# Altium PCB nexnclock_one_in12_6x_rev_1_0.PcbDoc (part 1 of 2)
Units mm, origin at the board's own origin, x right, y up, seen from the top; angles counter-clockwise.
Board outline 156 x 35 mm, 2 copper layers (Top Layer, Bottom Layer), stack 1.571 mm thick; 50 components, 43 nets, 219 pads, 67 vias.
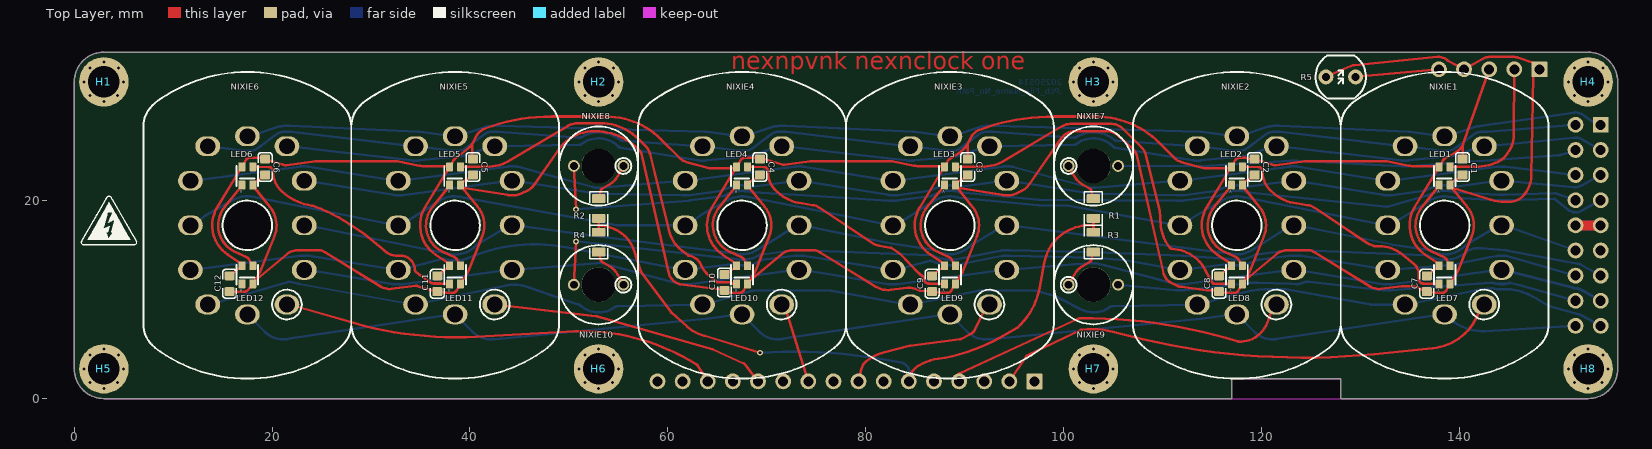
[diagram p0: Top Layer view]
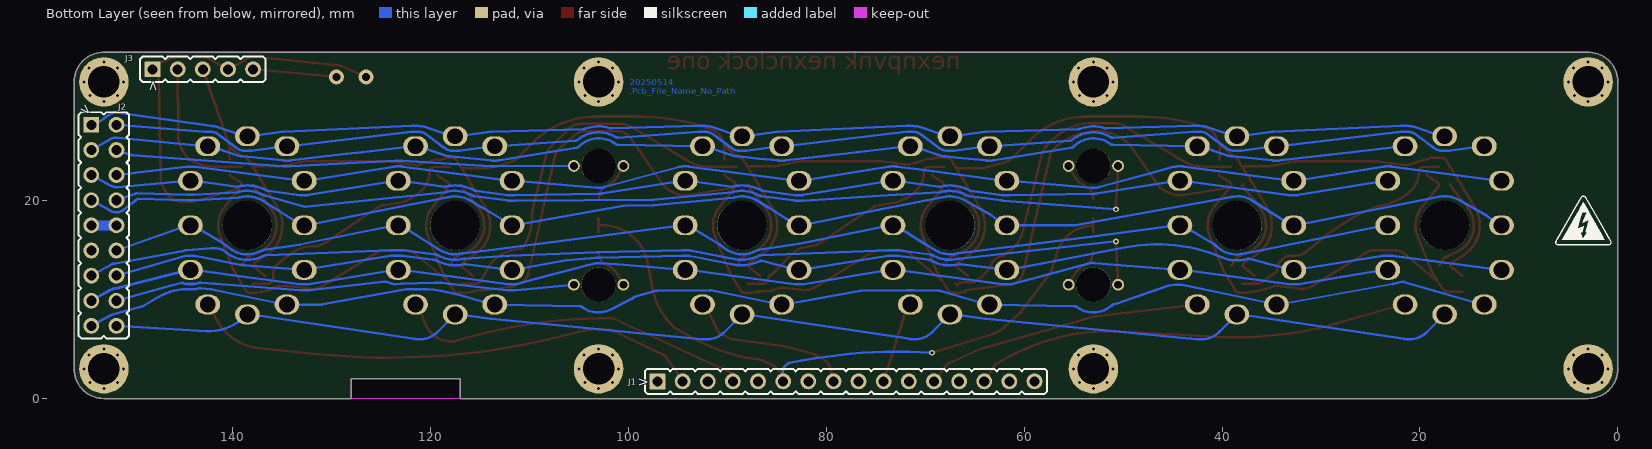
[diagram p1: Bottom Layer view, seen from below]
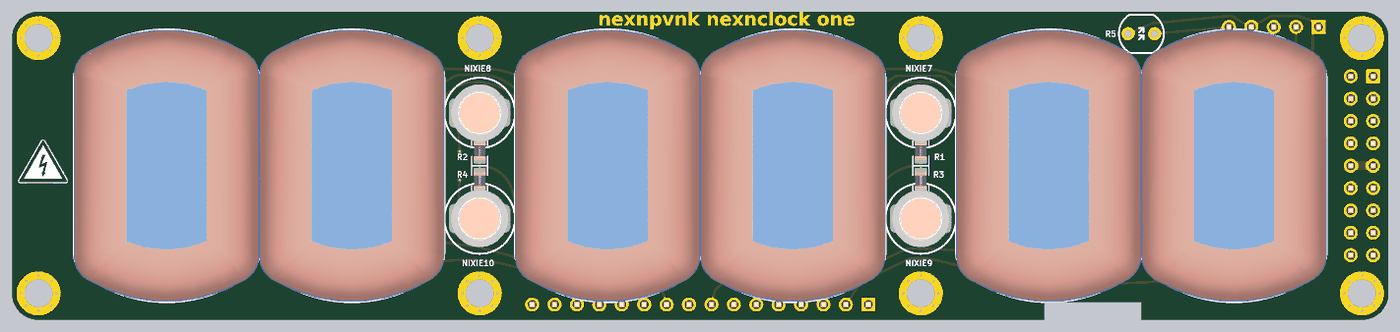
[diagram p3: 3D render of the assembled board from above, using the file's embedded part models]
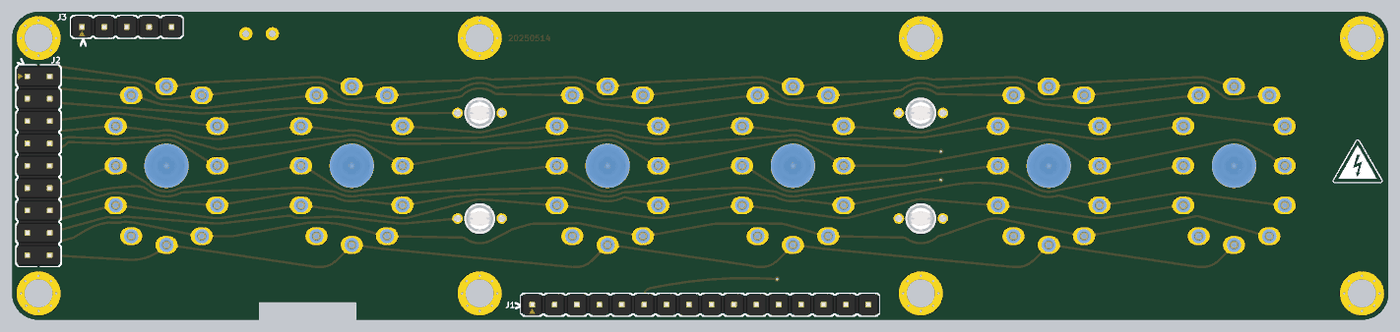
[diagram p4: 3D render of the assembled board from below, using the file's embedded part models]

## Layer stack, top to bottom
Top Solder: solder mask 0.0102, Solder Resist, Dk 3.5
Top Layer: signal copper 0.0356
Dielectric 1: dielectric 1.5, FR-4, Dk 4.8
Bottom Layer: signal copper 0.0356
Bottom Solder: solder mask 0.0102, Solder Resist, Dk 3.5

## Board outline
3,0 cw(c3,3) 0,3 0,32 cw(c3,32) 3,35 153,35 cw(c153,32) 156,32 156,3 cw(c153,3) 153,0 128,0 128,2 117,2 117,0

## Design rules (kind name [scope] priority, off if disabled: settings)
Clearance [All] p1: gap=0.127 ignorepadtopadclearanceinfootprint=FALSE except(0: SMDPad-Text THPad-Text Via-Text Fill-Text Poly-Text Region-Text Text-Text; 0.2: Arc-Arc Arc-SMDPad Track-SMDPad; 0.3: Arc-Track Arc-THPad Arc-Via Arc-Fill Arc-Poly Arc-Region Arc-Text Arc-Hole Track-Track Track-THPad Track-Via Track-Fill Track-Poly Track-Region Track-Text Track-Hole)
ComponentClearance ComponentClearance_1 [(Footprint = 'RSH31A')] p1: gap=-5 collisioncheckmode=3 verticalgap=-5 showdistances=FALSE
ComponentClearance [All] p2: gap=0 collisioncheckmode=3 verticalgap=0 showdistances=FALSE
DiffPairsRouting [All] p1: maxlimit=1 minlimit=0.127 mostfreqgap=0.3 toplayer_minwidth=0.127 toplayer_maxwidth=0.381 toplayer_prefwidth=0.3 bottomlayer_minwidth=0.127 bottomlayer_maxwidth=0.381 bottomlayer_prefwidth=0.3 maxuncoupledlength=12.7
Height [All] p1: minheight=0 maxheight=100 prefheight=12.7
HoleSize [All] p1: absolutevalues=TRUE maxlimit=5 minlimit=0.025 maxpercent=80.000 minpercent=20.000
HoleToHoleClearance [All] p1: gap=0.127 allowstackedmicrovias=TRUE
MinimumSolderMaskSliver [All] p1: minsoldermaskwidth=0.05
PolygonConnect PolygonConnect_1 [All] p1: thpad.connectstyle=Relief thpad.reliefconductorwidth=0.254 thpad.reliefentries=4 thpad.polygonreliefangle="90 Angle" thpad.airgapwidth=0.127 smdpad.connectstyle=Relief smdpad.reliefconductorwidth=0.254 smdpad.reliefentries=4 smdpad.polygonreliefangle="90 Angle" smdpad.airgapwidth=0.127 via.connectstyle=Direct via.reliefconductorwidth=0.254 via.reliefentries=4 via.polygonreliefangle="90 Angle" via.airgapwidth=0.254
PolygonConnect PolygonConnect_2 [HasFootprint('R0201')] p2: thpad.connectstyle=Relief thpad.reliefconductorwidth=0.127 thpad.reliefentries=4 thpad.polygonreliefangle="90 Angle" thpad.airgapwidth=0.127 smdpad.connectstyle=Relief smdpad.reliefconductorwidth=0.127 smdpad.reliefentries=4 smdpad.polygonreliefangle="90 Angle" smdpad.airgapwidth=0.127 via.connectstyle=Direct via.reliefconductorwidth=0.254 via.reliefentries=4 via.polygonreliefangle="90 Angle" via.airgapwidth=0.254
RoutingVias [All] p1: holewidth=0.3 width=0.6 viastyle="Through Hole" minholewidth=0.1 minwidth=0.3 maxholewidth=1 maxwidth=1.27
SilkToSilkClearance [All] p1: silktosilkclearance=0
SilkToSolderMaskClearance [IsPad] p1: minsilkscreentomaskgap=0.127 clearancetoexposedcopper=TRUE
SolderMaskExpansion [All] p1: expansion=0.05 istentingtop=FALSE
SupplyNets "Schematic Supply Nets_2" [InNet('HVGND')] p1: voltage=0.000
SupplyNets "Schematic Supply Nets_1" [InNet('VCC_5V0')] p2: voltage=0.000
SupplyNets "Schematic Supply Nets" [InNet('GND')] p3: voltage=0.000
Width [All] p1: maxlimit=6 minlimit=0.2 preferedwidth=0.254
22 further rules are at their usual default settings.

## Components (designator, comment, footprint, x,y, rotation, side; value= is the part's Value field where it differs from the comment)
C1 "CAP" C0603 140.3,23.4 r270 top value=100nF
C2 "CAP" C0603 119.3,23.4 r270 top value=100nF
C3 "CAP" C0603 90.3,23.4 r270 top value=100nF
C4 "CAP" C0603 69.3,23.4 r270 top value=100nF
C5 "CAP" C0603 40.3,23.4 r270 top value=100nF
C6 "CAP" C0603 19.3,23.4 r270 top value=100nF
C7 "CAP" C0603 136.7,11.6 r270 top value=100nF
C8 "CAP" C0603 115.7,11.6 r270 top value=100nF
C9 "CAP" C0603 86.7,11.6 r270 top value=100nF
C10 "CAP" C0603 65.717,11.728 r270 top value=100nF
C11 "CAP" C0603 36.7,11.6 r270 top value=100nF
C12 "CAP" C0603 15.7,11.6 r270 top value=100nF
H1 "MOUNT_HOLE" MOUNT_HOLE_D_3_2_MM 3,32 r0 top locked
H2 "MOUNT_HOLE" MOUNT_HOLE_D_3_2_MM 53,32 r0 top
H3 "MOUNT_HOLE" MOUNT_HOLE_D_3_2_MM 103,32 r0 top
H4 "MOUNT_HOLE" MOUNT_HOLE_D_3_2_MM 153,32 r0 top
H5 "MOUNT_HOLE" MOUNT_HOLE_D_3_2_MM 3,3 r0 top locked
H6 "MOUNT_HOLE" MOUNT_HOLE_D_3_2_MM 53,3 r0 top
H7 "MOUNT_HOLE" MOUNT_HOLE_D_3_2_MM 103,3 r0 top
H8 "MOUNT_HOLE" MOUNT_HOLE_D_3_2_MM 153,3 r0 top
J1 "P_HEADER_1X16" P_HEADER_STRAIGHT_2_54_1X16 78,1.73 r180 bottom
J2 "P_HEADER_2X9" P_HEADER_STRAIGHT_2_54_2X9 153,17.5 r270 bottom locked
J3 "P_HEADER_1X5" P_HEADER_STRAIGHT_2_54_1X5 143,33.27 r180 bottom
LED1 "WS2812B-2020" LED-SMD_4P-L2.0-W2.0-TL_WS2812B-2020 138.5,22.5 r90 top
LED2 "WS2812B-2020" LED-SMD_4P-L2.0-W2.0-TL_WS2812B-2020 117.5,22.5 r90 top
LED3 "WS2812B-2020" LED-SMD_4P-L2.0-W2.0-TL_WS2812B-2020 88.5,22.5 r90 top
LED4 "WS2812B-2020" LED-SMD_4P-L2.0-W2.0-TL_WS2812B-2020 67.5,22.5 r90 top
LED5 "WS2812B-2020" LED-SMD_4P-L2.0-W2.0-TL_WS2812B-2020 38.5,22.5 r90 top
LED6 "WS2812B-2020" LED-SMD_4P-L2.0-W2.0-TL_WS2812B-2020 17.5,22.5 r90 top
LED7 "WS2812B-2020" LED-SMD_4P-L2.0-W2.0-TL_WS2812B-2020 138.5,12.5 r90 top
LED8 "WS2812B-2020" LED-SMD_4P-L2.0-W2.0-TL_WS2812B-2020 117.5,12.5 r90 top
LED9 "WS2812B-2020" LED-SMD_4P-L2.0-W2.0-TL_WS2812B-2020 88.5,12.5 r90 top
LED10 "WS2812B-2020" LED-SMD_4P-L2.0-W2.0-TL_WS2812B-2020 67.5,12.5 r90 top
LED11 "WS2812B-2020" LED-SMD_4P-L2.0-W2.0-TL_WS2812B-2020 38.5,12.5 r90 top
LED12 "WS2812B-2020" LED-SMD_4P-L2.0-W2.0-TL_WS2812B-2020 17.5,12.5 r90 top
NIXIE1 "IN-12" RSH31A 138.5,17.5 r0 top locked
NIXIE2 "IN-12" RSH31A 117.5,17.5 r0 top locked
NIXIE3 "IN-12" RSH31A 88.5,17.5 r0 top locked
NIXIE4 "IN-12" RSH31A 67.5,17.5 r0 top locked
NIXIE5 "IN-12" RSH31A 38.5,17.5 r0 top locked
NIXIE6 "IN-12" RSH31A 17.5,17.5 r0 top locked
NIXIE7 "NEON_LAMP_WITH_HOLE" NEON_LAMP_WITH_HOLE 103,23.5 r0 top
NIXIE8 "NEON_LAMP_WITH_HOLE" NEON_LAMP_WITH_HOLE 53,23.5 r180 top
NIXIE9 "NEON_LAMP_WITH_HOLE" NEON_LAMP_WITH_HOLE 103,11.5 r0 top
NIXIE10 "NEON_LAMP_WITH_HOLE" NEON_LAMP_WITH_HOLE 53,11.5 r180 top
R1 "RESISTOR" R0805 103,19.2 r90 top value=10k
R2 "RESISTOR" R0805 53,19.2 r90 top value=10k
R3 "RESISTOR" R0805 103,15.8 r270 top value=10k
R4 "RESISTOR" R0805 53,15.8 r270 top value=10k
R5 "PHOTORESISTOR" GL55XX_2 128,32.5 r180 top value=10k

## Footprints (in the part's own frame and the unit in brackets; to place one, negate y for a bottom-side part, rotate by r counter-clockwise, add the part's x,y. Pads: shape width x height; smd on the part's side, far side on the other; paste and mask are expansions set on the pad)
C0603 [mm]
  rrect25% 0.9x1 smd mask+0.05: 1(-0.8,0) 2(0.8,0)
  silkscreen extent -1.45,-0.7 1.45,0.7, body extent -0.8,-0.4 0.8,0.4, height 0.82
GL55XX_2 [mm] "Photoresistor 3mm pitch"
  round 1.5 hole 0.8 mask+0.05: 1(-1.5,0) 2(1.5,0)
  silkscreen extent -2.55,-2.15 2.55,2.2
LED-SMD_4P-L2.0-W2.0-TL_WS2812B-2020 [mm]
  rrect20% 0.9x0.7 smd mask+0.05: 1(-0.915,0.55) 2(-0.915,-0.55) 3(0.915,-0.55) 4(0.915,0.55)
  silkscreen extent -1,-1.1 1,1.1, body extent -1.1,-1 1.1,1, height 0.84
MOUNT_HOLE_D_3_2_MM [mm]
  round 5 hole 3.2 mask+0.05: 1(0,0)
NEON_LAMP_WITH_HOLE [mm] "INS-1, IN-3"
  round 1.2 hole 0.8 unplated mask+0.05: 1(-2.5,0) 2(2.5,0)
  round 3.5 hole 3.5 unplated mask+0.05: HOLE(0,0)
  silkscreen extent -4,-4 4,4, body extent -3.5,-3.25 3.5,3.25, height 25
P_HEADER_STRAIGHT_2_54_1X5 [mm]
  rrect10% 1.6x1.6 hole 1.02 paste-2539.97 mask+0.05: 1(-5.08,0)
  round 1.6 hole 1.02 paste-2539.97 mask+0.05: 2(-2.54,0) 3(0,0)
  round 1.6 hole 1.02 mask+0.05: 4(2.54,0) 5(5.08,0)
  silkscreen extent -6.35,-1.27 6.35,1.27, body extent -6.35,-1.25 6.35,1.25, height 8.55
P_HEADER_STRAIGHT_2_54_1X16 [mm]
  rrect10% 1.6x1.6 hole 1.02 paste-2539.97 mask+0.05: 1(-19.05,0)
  round 1.6 hole 1.02 paste-2539.97 mask+0.05: 2(-16.51,0) 3(-13.97,0)
  round 1.6 hole 1.02 mask+0.05: 4(-11.43,0) 5(-8.89,0) 6(-6.35,0) 7(-3.81,0) 8(-1.27,0) 9(1.27,0) 10(3.81,0) 11(6.35,0) 12(8.89,0) 13(11.43,0) 14(13.97,0) 15(16.51,0) 16(19.05,0)
  silkscreen extent -20.32,-1.27 20.32,1.27, body extent -20.32,-1.25 20.32,1.25, height 8.55
P_HEADER_STRAIGHT_2_54_2X9 [mm]
  rrect10% 1.6x1.6 hole 1.02 paste-2539.97 mask+0.05: 1(-10.16,-1.27)
  round 1.6 hole 1.02 paste-2539.97 mask+0.05: 2(-10.16,1.27) 3(-7.62,-1.27)
  round 1.6 hole 1.02 mask+0.05: 4(-7.62,1.27) 5(-5.08,-1.27) 6(-5.08,1.27) 7(-2.54,-1.27) 8(-2.54,1.27) 9(0,-1.27) 10(0,1.27) 11(2.54,-1.27) 12(2.54,1.27) 13(5.08,-1.27) 14(5.08,1.27) 15(7.62,-1.27) 16(7.62,1.27) 17(10.16,-1.27) 18(10.16,1.27)
  silkscreen extent -11.43,-2.54 11.43,2.54, body extent -11.43,-2.52 11.43,2.48, height 8.55
R0805 [mm]
  rrect20% 0.9x1.35 smd mask+0.05: 1(-1,0) 2(1,0)
  silkscreen extent -1.7,-0.9 1.7,0.9, body extent -1,-0.63 1,0.63, height 0.53
RSH31A [mm] "IN-12A, IN-12B, IN-15A, IN-15B"
  oval 2.5x2 hole 1.6 paste-2539.97 mask+0.05: 1(4,-8) 2(5.75,-4.5) 3(5.75,0) 4(5.75,4.5) 5(4,8) 6(0,9) 7(-4,8) 8(-5.75,4.5) 9(-5.75,0) 10(-5.75,-4.5) 11(-4,-8) 12(0,-9)
  silkscreen extent -10.5,-15.5 10.5,15.5, body extent -10.5,-15.48 10.5,15.48, height 29

## Part data
C1 C2 C3 C4 C5 C6 C7 C8 C9 C10 C11 C12: Dielectric=X7R, Manufacturer=_manufacturer, Voltage=50V, Part Reference=CC0603KRX7R9BB104, PCB Footprint=C0603
H1 H2 H3 H4 H5 H6 H7 H8 J1 J2 J3 LED1 LED2 LED3 LED4 LED5 LED6 LED7 LED8 LED9 LED10 LED11 LED12 R5: Manufacturer=_manufacturer
  H1 H2 H3 H4 H5 H6 H7 H8: PCB Footprint=MOUNT_HOLE_D_3_2_MM, Procurement Type=DNP
  J1: Part Reference=_part, PCB Footprint=P_HEADER_STRAIGHT_2_54_1X16
  J2: Part Reference=_part, PCB Footprint=P_HEADER_STRAIGHT_2_54_2X9
  J3: Part Reference=_part, PCB Footprint=P_HEADER_STRAIGHT_2_54_1X5
  LED1 LED2 LED3 LED4 LED5 LED6 LED7 LED8 LED9 LED10 LED11 LED12: Part Reference=_part, PCB Footprint=LED-SMD_4P-L2.0-W2.0-TL_WS2812B-2020
  R5: Part Reference=_part, PCB Footprint=GL55XX_2
NIXIE1 NIXIE2 NIXIE3 NIXIE4 NIXIE5 NIXIE6: Manufacturer=USSR, Part Reference=_part, PCB Footprint=RSH31A, Procurement Type=DNP
NIXIE7 NIXIE8 NIXIE9 NIXIE10: "INS-1, IN-3", Manufacturer=USSR, Part Reference=_part, PCB Footprint=NEON_LAMP_WITH_HOLE, Procurement Type=DNP
R1 R2 R3 R4: Manufacturer=_manufacturer, Tolerancy=5%, Part Reference=_part, PCB Footprint=R0805

## Free pads (board coordinates)
  round 5 hole 5 mask+0.05: 1(17.5,17.5) 1(38.5,17.5) 1(67.5,17.5) 1(88.5,17.5) 1(117.5,17.5) 1(138.5,17.5)

## Via types
v1: diameter 0.6, hole 0.3, Top Layer to Bottom Layer, tented bottom, 64 vias
v2: diameter 0.6, hole 0.3, Top Layer to Bottom Layer, tented both sides, 2 vias
v3: diameter 0.6, hole 0.3, Top Layer to Bottom Layer, tented top, 1 vias

## Nets (pads, with @x,y where several pads share a name; then routed paths per layer and width w, separated by ;. In a path a pad name is that pad's centre, name@x,y a point inside that pad or via, vN(x,y) a via of type N, cw(c..) or ccw(c..) an arc to the next point about the centre after c; other vN are vias at no path point)
A0: J1.2 NIXIE1.1 | length 52.4
  Top Layer w0.254: J1.2@94.51,1.73 96.193,4.218 cw(c96.566,3.966) 96.372,4.372 101.732,6.925 cw(c101.925,6.518) 101.876,6.966 cw(c102.803,-1.728) 101.877,6.966 cw(c102.803,-1.728) 104.95,6.747 106.566,6.338 ccw(c124.281,76.227) 131.392,4.479 131.395,4.479 137.275,5.068 ccw(c136.725,10.586) 141.9,8.591 142.25,9.5 NIXIE1.1@142.5,9.5
A1: J1.4 NIXIE2.1 | length 36.5
  Top Layer w0.254: J1.4@89.43,1.73 89.316,1.932 cw(c89.708,2.153) 89.519,2.562 101.39,8.033 cw(c101.712,7.337) 101.702,8.104 cw(c101.712,7.337) 101.703,8.104 cw(c102.108,-44.322) 117.549,5.78 ccw(c117.679,6.211) 117.644,5.762 ccw(c117.679,6.211) 117.649,5.762 ccw(c117.845,8.651) 120.558,7.639 121.25,9.5 NIXIE2.1@121.5,9.5
A2: J1.6 R1.1 R2.1 R3.1 R4.1 | length 68.4
  Top Layer w0.254: R4.1@53,16.8 53,17.457 ; R2.1@53,18.2 53,17.457 ; v3(69.3,4.625) 63.662,6.364 cw(c64.562,10.156) 61.963,7.252 cw(c64.562,10.156) 61.962,7.253 60.377,8.673 60.375,8.674 cw(c60.546,8.862) 60.373,8.676 cw(c60.546,8.862) 60.344,8.709 57.286,12.785 57.285,12.786 cw(c57.489,12.937) 57.247,12.861 56.616,14.893 ccw(c53.065,13.717) 56.616,14.895 ccw(c53.065,13.717) 53.001,17.457 ; J1.6@84.362,1.73 cw(c86.259,1.656) 85.322,3.307 cw(c86.259,1.656) 85.324,3.308 85.429,3.367 cw(c88.192,-1.525) 87.308,4.024 cw(c88.192,-1.525) 87.312,4.024 ccw(c84.804,21.545) 93.515,6.138 95.286,7.139 ccw(c95.063,7.53) 95.368,7.199 ccw(c90.404,12.548) 95.37,7.2 ccw(c90.404,12.548) 97.578,11.211 98.046,13.732 cw(c102.578,12.891) 102.576,17.501 102.999,17.501
  Top Layer w0.3: R3.1@103,16.8 103,17.5 R1.1@103,18.2
  Bottom Layer w0.254: v3(69.3,4.625) 69.312,4.626 cw(c72.801,-46.388) 82.278,3.859 82.297,3.855 83.718,3.59 cw(c83.636,3.148) 83.837,3.55 cw(c83.636,3.148) 83.884,3.523 cw(c83.079,2.307) 84.296,3.111 cw(c83.921,2.863) 84.371,2.863 cw(c83.921,2.863) 84.371,2.855 J1.6@84.35,1.73
A3: J1.8 NIXIE3.1 | length 17
  Top Layer w0.254: J1.8@79.27,1.73 79.564,2.996 cw(c80.932,2.675) 80.068,3.783 cw(c83.13,-0.143) 81.885,4.677 84.436,5.339 cw(c84.549,4.904) 84.492,5.35 cw(c84.55,4.904) 84.493,5.35 89.487,5.97 89.488,5.97 ccw(c89.431,6.416) 89.638,6.017 90.526,6.479 ; 90.527,6.479 ccw(c89.959,7.567) 91.065,7.035 92.25,9.5 NIXIE3.1@92.5,9.5
A4: J1.10 NIXIE4.1 | length 8.4
  Top Layer w0.254: NIXIE4.1@71.5,9.5 71.75,9.5 J1.10@74.19,1.73
A5: J1.12 NIXIE5.1 | length 28.3
  Top Layer w0.254: NIXIE5.1@42.5,9.5 42.75,9.5 52.743,8.31 cw(c52.548,6.672) 52.96,8.269 64.492,4.984 ; 64.493,4.984 cw(c64.369,4.552) 64.556,4.961 67.648,3.546 67.65,3.546 cw(c67.461,3.137) 67.818,3.411 J1.12@69.11,1.73
A6: J1.14 NIXIE6.1 | length 44.5
  Top Layer w0.254: NIXIE6.1@21.5,9.5 21.75,9.5 28.231,7.642 ccw(c38.604,43.803) 40.65,6.239 50.642,6.783 cw(c51.626,-11.284) 54.303,6.611 cw(c50.96,-15.7) 62.874,3.457 cw(c62.672,3.134) 62.991,3.342 62.992,3.341 J1.14@64.03,1.73
AL_DATA: J3.2 LED1.3 | length 14.9
  Top Layer w0.254: LED1.3@139.05,23.415 139.273,23.415 141.577,23.415 ccw(c141.575,28.947) 141.579,23.415 ccw(c141.575,28.947) 143.618,23.806 ccw(c142.879,26.011) 144.814,24.721 145.034,25.052 ccw(c142.855,26.505) 145.471,26.652 cw(c145.92,26.676) 145.47,26.68 ; 145.47,26.681 J3.2@145.54,33.27
C0: J2.1 NIXIE1.6 NIXIE2.6 NIXIE3.6 NIXIE4.6 NIXIE5.6 NIXIE6.6 | length 138.5
  Bottom Layer w0.254: NIXIE6.6@17.5,26.5 17.75,26.5 20.601,27.445 20.607,27.446 ; 20.607,27.446 cw(c21.25,25.5) 21.25,27.55 21.75,27.55 cw(c21.75,25.5) 21.843,27.548 21.849,27.548 34.817,26.948 cw(c34.75,25.5) 34.94,26.938 38.25,26.5 38.75,26.5 41.605,27.446 cw(c42.25,25.5) 42.229,27.55 42.232,27.55 cw(c42.25,25.5) 42.246,27.55 42.744,27.55 42.749,27.55 cw(c42.75,26.95) 42.752,27.55 cw(c42.75,25.5) 42.803,27.549 42.814,27.549 ; 42.815,27.549 cw(c42.801,27.099) 42.816,27.549 42.82,27.549 51.656,27.296 ccw(c51.667,27.746) 51.667,27.296 ccw(c51.667,27.746) 51.795,27.315 51.859,27.334 cw(c53,23.5) 54.359,27.262 54.422,27.239 ccw(c54.573,27.663) 54.559,27.213 63.787,26.95 63.794,26.949 cw(c63.75,25.5) 63.939,26.938 63.944,26.937 67.25,26.5 NIXIE4.6@67.5,26.5 67.75,26.5 70.601,27.445 70.607,27.446 ; 70.607,27.446 cw(c71.25,25.5) 71.25,27.55 71.75,27.55 cw(c71.75,25.5) 71.843,27.548 71.849,27.548 84.817,26.948 cw(c84.75,25.5) 84.94,26.938 88.25,26.5 88.75,26.5 91.605,27.446 cw(c92.25,25.5) 92.229,27.55 92.232,27.55 cw(c92.25,25.5) 92.246,27.55 92.75,27.55 cw(c92.75,25.5) 92.808,27.549 92.814,27.549 101.656,27.296 ccw(c101.667,27.746) 101.667,27.296 ccw(c101.667,27.746) 101.794,27.315 101.859,27.334 cw(c103,23.5) 104.359,27.262 104.421,27.24 ccw(c104.573,27.663) 104.559,27.213 113.791,26.949 cw(c113.75,25.5) 113.94,26.938 117.25,26.5 NIXIE2.6@117.5,26.5 117.75,26.5 120.601,27.445 120.607,27.446 ; 120.607,27.446 cw(c121.25,25.5) 121.25,27.55 121.75,27.55 cw(c121.75,25.5) 121.843,27.548 121.849,27.548 134.817,26.948 cw(c134.75,25.5) 134.94,26.938 138.25,26.5 NIXIE1.6@138.5,26.5 138.75,26.5 141.605,27.446 cw(c142.25,25.5) 142.229,27.55 151.551,28.897 cw(c151.73,27.66) 152.454,28.679 153.333,28.055 153.334,28.054 ccw(c153.593,28.422) 153.593,27.972 153.62,27.972 J2.1@154.27,27.66
C1: J2.2 NIXIE1.7 NIXIE2.7 NIXIE3.7 NIXIE4.7 NIXIE5.7 NIXIE6.7 | length 142.7
  Bottom Layer w0.254: NIXIE6.7@13.5,25.5 13.75,25.5 17.06,25.062 ccw(c17.25,26.5) 17.247,25.05 17.753,25.05 ccw(c17.75,26.5) 18.62,25.34 19.247,25.81 20.38,26.66 cw(c21.25,25.5) 21.25,26.95 21.75,26.95 cw(c21.75,25.5) 21.918,26.94 30.851,25.897 34.25,25.5 34.75,25.5 38.06,25.062 ccw(c38.25,26.5) 38.247,25.05 38.753,25.05 ccw(c38.75,26.5) 39.62,25.34 41.377,26.657 41.382,26.661 cw(c42.25,25.5) 42.219,26.95 cw(c42.25,25.5) 42.221,26.95 cw(c42.25,25.5) 42.25,26.95 42.75,26.95 cw(c42.75,25.5) 42.753,26.95 42.757,26.95 cw(c42.75,25.5) 42.851,26.946 42.857,26.946 51.013,26.368 ccw(c51.043,26.817) 51.264,26.424 51.335,26.464 cw(c53,23.5) 55.123,26.155 ccw(c55.404,26.508) 55.371,26.059 63.25,25.5 NIXIE4.7@63.5,25.5 63.503,25.5 cw(c63.497,23.85) 63.704,25.487 67.068,25.061 ccw(c67.25,26.5) 67.25,25.05 67.75,25.05 ccw(c67.75,26.5) 68.62,25.34 70.071,26.428 70.38,26.66 cw(c71.25,25.5) 71.25,26.95 71.75,26.95 cw(c71.75,25.5) 71.918,26.94 80.851,25.897 84.25,25.5 84.75,25.5 88.06,25.062 ccw(c88.25,26.5) 88.247,25.05 88.753,25.05 ccw(c88.75,26.5) 89.62,25.34 91.377,26.657 91.382,26.661 cw(c92.25,25.5) 92.221,26.95 ; 92.221,26.95 cw(c92.25,25.5) 92.25,26.95 92.75,26.95 cw(c92.75,25.5) 92.851,26.946 92.857,26.946 101.013,26.368 ccw(c101.043,26.817) 101.264,26.424 101.335,26.464 cw(c103,23.5) 105.123,26.156 ccw(c105.404,26.508) 105.371,26.059 113.25,25.5 113.75,25.5 117.06,25.062 ccw(c117.25,26.5) 117.25,25.05 117.75,25.05 ccw(c117.75,26.5) 118.62,25.34 120.072,26.429 120.38,26.66 cw(c121.25,25.5) 121.25,26.95 121.75,26.95 cw(c121.75,25.5) 121.918,26.94 130.851,25.897 134.25,25.5 NIXIE1.7@134.5,25.5 134.75,25.5 138.06,25.062 ccw(c138.25,26.5) 138.247,25.05 138.753,25.05 ccw(c138.75,26.5) 139.62,25.34 141.377,26.657 141.382,26.661 cw(c142.25,25.5) 142.25,26.95 142.753,26.95 cw(c142.75,25.5) 142.844,26.947 ; 142.85,26.947 142.844,26.947 ; J2.2@151.73,27.66 142.844,26.947
C2: J2.3 NIXIE1.5 NIXIE2.5 NIXIE3.5 NIXIE4.5 NIXIE5.5 NIXIE6.5 | length 135.3
  Bottom Layer w0.254: NIXIE6.5@21.5,25.5 21.75,25.5 26.913,24.897 34.082,24.06 ccw(c34.25,25.5) 34.25,24.05 34.75,24.05 ccw(c34.75,25.5) 34.893,24.057 38.952,24.46 ccw(c38.75,26.5) 39.395,24.554 42.25,25.5 NIXIE5.5@42.5,25.5 42.75,25.5 51.049,25.644 ; 51.05,25.644 ccw(c51.041,26.093) 51.314,25.735 cw(c53,23.5) 54.945,25.514 55,25.461 ccw(c55.312,25.785) 55.238,25.341 61.77,24.273 63.016,24.069 ccw(c63.25,25.5) 63.25,24.05 63.75,24.05 ccw(c63.75,25.5) 63.893,24.057 66.75,24.341 67.952,24.46 ccw(c67.75,26.5) 68.395,24.554 71.25,25.5 NIXIE4.5@71.5,25.5 71.75,25.5 76.913,24.897 82.204,24.279 84.082,24.06 ccw(c84.25,25.5) 84.25,24.05 84.75,24.05 ccw(c84.75,25.5) 84.893,24.057 86.78,24.244 88.952,24.46 ccw(c88.75,26.5) 89.395,24.554 92.25,25.5 NIXIE3.5@92.5,25.5 92.75,25.5 101.049,25.644 ; 101.05,25.644 ccw(c101.041,26.093) 101.312,25.734 cw(c103,23.5) 104.945,25.514 105.001,25.46 ccw(c105.312,25.785) 105.238,25.341 111.755,24.275 113.016,24.069 ccw(c113.25,25.5) 113.25,24.05 113.75,24.05 ccw(c113.75,25.5) 113.893,24.057 117.592,24.424 117.952,24.46 ccw(c117.75,26.5) 118.395,24.554 121.25,25.5 NIXIE2.5@121.5,25.5 121.75,25.5 126.913,24.897 128.45,24.717 134.082,24.06 ccw(c134.25,25.5) 134.25,24.05 134.75,24.05 ccw(c134.75,25.5) 134.893,24.057 138.952,24.46 ccw(c138.75,26.5) 139.395,24.554 142.25,25.5 142.75,25.5 151.609,26.364 cw(c151.73,25.12) 152.345,26.208 J2.3@154.27,25.12
C3: J2.4 NIXIE7.2 | length 46.4
  Bottom Layer w0.254: NIXIE7.2@105.5,23.5 113.237,23.45 ccw(c113.25,25.5) 113.25,23.45 113.75,23.45 ccw(c113.75,25.5) 113.885,23.454 122.865,24.046 cw(c123,22) 123,24.05 123.5,24.05 cw(c123.5,22) 123.615,24.047 134.135,23.453 ccw(c134.25,25.5) 134.25,23.45 134.75,23.45 ccw(c134.75,25.5) 134.904,23.456 150.05,24.595 150.175,24.604 ccw(c150.141,25.053) 150.28,24.625 151.605,25.056 ccw(c151.464,25.483) J2.4@151.73,25.12
C4: J2.5 NIXIE1.4 NIXIE2.4 NIXIE3.4 NIXIE4.4 NIXIE5.4 NIXIE6.4 | length 132.7
  Bottom Layer w0.254: NIXIE6.4@23.25,22 23.5,22 27.211,21.394 32.266,20.569 ccw(c32.5,22) 32.5,20.55 33,20.55 ccw(c33,22) 33.191,20.563 44,22 NIXIE5.4@44.25,22 44.5,22 52.566,20.734 ccw(c53,23.5) 52.951,20.7 61.474,20.55 ccw(c61.5,22) 61.497,20.55 62.003,20.55 ccw(c62,22) 62.191,20.563 65.447,20.996 65.449,20.996 ccw(c65.414,21.247) 65.537,21.025 cw(c67.5,17.5) 65.545,21.03 cw(c67.5,17.5) 68.473,21.416 ; 68.474,21.416 ccw(c68.534,21.662) 68.567,21.411 ; 68.568,21.411 73,22 NIXIE4.4@73.25,22 73.5,22 77.211,21.394 82.266,20.569 ccw(c82.5,22) 82.5,20.55 83,20.55 ccw(c83,22) 83.191,20.563 86.447,20.996 ccw(c86.413,21.247) 86.533,21.024 86.589,21.054 cw(c88.5,17.5) 89.471,21.416 ; 89.473,21.416 ccw(c89.534,21.662) 89.567,21.411 94,22 NIXIE3.4@94.25,22 94.5,22 102.566,20.734 ccw(c103,23.5) 102.951,20.7 111.474,20.55 ccw(c111.5,22) 111.5,20.55 112,20.55 ccw(c112,22) 112.191,20.563 115.447,20.996 ccw(c115.413,21.247) 115.533,21.024 115.587,21.052 cw(c117.5,17.5) 118.474,21.416 ccw(c118.534,21.662) 118.566,21.41 118.568,21.411 123,22 NIXIE2.4@123.25,22 123.5,22 127.211,21.394 132.266,20.569 ccw(c132.5,22) 132.5,20.55 133,20.55 ccw(c133,22) 133.191,20.563 136.447,20.996 ccw(c136.413,21.247) 136.533,21.024 136.58,21.049 136.589,21.054 cw(c138.5,17.5) 139.462,21.419 139.474,21.416 ; 139.474,21.416 ccw(c139.534,21.662) 139.567,21.411 NIXIE1.4@144.246,22.033 ; NIXIE1.4@144.25,22 144.5,22 151.62,21.358 ccw(c151.73,22.58) 152.323,21.506 J2.5@154.27,22.58
C5: J2.6 NIXIE1.8 NIXIE2.8 NIXIE3.8 NIXIE4.8 NIXIE5.8 NIXIE6.8 | length 141.4
  Bottom Layer w0.254: NIXIE6.8@11.75,22 12,22 22.809,23.437 cw(c23,22) 23,23.45 23.5,23.45 cw(c23.5,22) 23.734,23.431 32.5,22 33,22 43.805,23.437 ; 43.919,23.448 43.923,23.448 cw(c44,22) 44,23.45 44.503,23.45 cw(c44.5,22) 44.875,23.401 44.88,23.399 47.804,22.615 52.43,21.375 ccw(c53,23.5) 53.183,21.308 61.5,22 NIXIE4.8@61.75,22 62,22 66.542,22.604 70.717,23.159 72.809,23.437 cw(c73,22) 73,23.45 73.5,23.45 cw(c73.5,22) 73.734,23.431 75.634,23.121 82.5,22 82.971,22 93.845,23.446 cw(c93.905,23) 93.905,23.45 94.503,23.45 cw(c94.5,22) 94.875,23.401 ; 94.879,23.4 94.883,23.398 ; 94.883,23.399 102.43,21.375 ccw(c103,23.5) 102.432,21.375 ccw(c103,23.5) 103.183,21.308 111.5,22 112,22 116.542,22.604 122.075,23.34 122.809,23.437 cw(c123,22) 123,23.45 123.5,23.45 cw(c123.5,22) 123.734,23.431 124.01,23.386 132.5,22 NIXIE1.8@132.75,22 133,22 143.786,23.434 cw(c143.82,23.183) 143.823,23.436 144.516,23.427 144.522,23.427 cw(c144.5,22) 144.666,23.417 144.672,23.417 149.396,22.857 J2.6@151.73,22.58
C6: J2.7 NIXIE1.9 NIXIE2.9 NIXIE3.9 NIXIE4.9 NIXIE5.9 NIXIE6.9 | length 149.5
  Bottom Layer w0.254: NIXIE6.9@11.75,17.5 12,17.5 13.331,18.544 cw(c13.609,18.19) 13.389,18.583 ; 13.39,18.583 16.061,20.075 cw(c17.5,17.5) 18.08,20.392 32.5,17.5 33,17.5 36.918,19.99 36.921,19.992 cw(c38.5,17.5) 38.422,20.449 ; 38.423,20.449 cw(c38.429,20.195) 38.455,20.448 38.805,20.411 cw(c38.5,17.5) 39.427,20.276 ccw(c39.506,20.518) 39.461,20.268 54.844,17.504 ccw(c54.887,17.754) 54.886,17.5 NIXIE4.9@61.75,17.5 62,17.5 63.331,18.544 cw(c63.609,18.19) 63.389,18.583 ; 63.39,18.583 63.803,18.814 cw(c63.927,18.592) 63.805,18.815 66.07,20.054 ccw(c65.537,21.025) 66.074,20.056 cw(c67.5,17.5) 68.211,20.339 ccw(c68.313,20.754) 68.213,20.339 ccw(c68.534,21.662) 68.271,20.326 74.699,19.065 82.5,17.5 83,17.5 85.777,19.265 cw(c85.914,19.051) 85.781,19.267 86.972,19.996 cw(c88.5,17.5) 89.209,20.34 ccw(c89.474,21.416) 89.219,20.337 ccw(c89.534,21.662) 89.405,20.307 ; 89.406,20.306 97.423,19.548 ccw(c97.475,20.1) 97.463,19.546 ccw(c97.475,20.1) 97.464,19.546 ; 97.465,19.546 100.436,19.485 cw(c100.431,19.231) 100.473,19.481 100.475,19.481 108.121,18.107 111.5,17.5 112,17.5 112.707,18.054 cw(c112.984,17.7) 112.752,18.086 114.53,19.155 cw(c114.661,18.938) 114.533,19.157 116.025,20.028 cw(c117.5,17.5) 118.21,20.339 ccw(c118.534,21.662) 118.271,20.326 125.163,18.972 132.5,17.5 NIXIE1.9@132.75,17.5 133,17.5 135.372,19.008 cw(c135.508,18.793) 135.375,19.009 136.961,19.99 cw(c138.5,17.5) 139.209,20.34 ccw(c139.474,21.416) 139.219,20.337 ccw(c139.534,21.662) 139.448,20.303 143.875,20.023 ccw(c143.91,20.576) 143.879,20.023 ccw(c144,22) 144,20.019 144.5,20.019 ccw(c144.5,22) 144.567,20.02 149.587,20.187 150.962,19.083 ccw(c151.73,20.04) 152.323,18.966 J2.7@154.27,20.04
C7: J2.8 NIXIE8.2 | length 106.3
  Top Layer w0.254: NIXIE8.2@50.5,23.5 v2(50.725,19.125)
  Bottom Layer w0.254: v2(50.725,19.125) 62.153,20.002 ccw(c62,22) 62.262,20.013 65.521,20.447 ccw(c65.448,20.996) 65.527,20.447 ccw(c65.414,21.247) 65.804,20.54 ccw(c65.537,21.025) 65.809,20.543 cw(c67.5,17.5) 68.342,20.878 ccw(c68.474,21.416) 68.347,20.877 ccw(c68.534,21.662) 68.483,20.856 72.91,20.576 ccw(c73,22) 72.913,20.576 82.378,20 ccw(c82.5,22) 82.5,19.996 83,19.996 ccw(c83,22) 83.264,20.013 ; 83.264,20.013 86.521,20.447 ccw(c86.447,20.996) 86.526,20.447 ccw(c86.413,21.247) 86.796,20.536 86.849,20.564 cw(c88.5,17.5) 89.339,20.878 ccw(c89.474,21.416) 89.347,20.876 ccw(c89.534,21.662) 89.458,20.858 97.466,20.101 ccw(c97.49,20.354) 97.488,20.1 111.485,19.996 ccw(c111.5,22) 111.5,19.996 112,19.996 ccw(c112,22) 112.264,20.013 115.52,20.446 ccw(c115.447,20.996) 115.526,20.447 ccw(c115.413,21.247) 115.796,20.536 115.842,20.561 115.853,20.567 cw(c117.5,17.5) 118.343,20.877 ccw(c118.474,21.416) 118.346,20.877 118.35,20.876 ccw(c118.534,21.662) 118.451,20.859 132.652,19.377 132.653,19.377 ccw(c132.678,19.63) 132.678,19.376 ccw(c132.678,19.63) 132.747,19.386 136.63,20.469 ccw(c136.413,21.247) 136.795,20.535 136.842,20.561 136.852,20.566 cw(c138.5,17.5) 139.335,20.879 139.342,20.878 ccw(c139.474,21.416) 139.347,20.876 ccw(c139.534,21.662) 139.483,20.856 143.91,20.576 ccw(c144,22) 144,20.573 144.5,20.573 ccw(c144.5,22) 144.549,20.574 149.653,20.748 149.654,20.748 cw(c149.661,20.495) 149.744,20.734 149.83,20.704 ; 149.831,20.704 J2.8@151.73,20.04
C8: J2.11
C9: J2.12 NIXIE1.3 NIXIE2.3 NIXIE3.3 NIXIE4.3 NIXIE5.3 NIXIE6.3 | length 134.2
  Bottom Layer w0.254: NIXIE6.3@23.25,17.5 23.5,17.5 37.553,14.699 cw(c37.348,13.67) 37.643,14.677 37.647,14.676 cw(c37.477,14.101) 37.648,14.676 ccw(c38.5,17.5) 40.622,15.451 cw(c41.377,14.721) 40.841,15.624 44,17.5 NIXIE5.3@44.25,17.5 44.5,17.5 53.238,16.37 66.633,14.689 cw(c66.464,13.338) 66.789,14.661 66.795,14.659 ccw(c67.5,17.5) 69.039,15.01 70.625,15.991 ccw(c70.491,16.207) 70.628,15.992 73,17.5 NIXIE4.3@73.25,17.5 73.5,17.5 82.725,15.662 82.726,15.661 ccw(c82.774,15.911) 82.734,15.66 86.785,15.014 cw(c86.571,13.669) 87.172,14.891 cw(c86.685,13.896) 87.179,14.888 cw(c86.932,14.392) 87.18,14.887 ccw(c88.5,17.5) 90.375,15.252 90.688,15.513 ccw(c90.525,15.708) 90.69,15.515 ; 90.691,15.516 cw(c91.377,14.721) 90.841,15.624 94,17.5 NIXIE3.3@94.25,17.5 94.5,17.5 114.082,14.968 ; 114.083,14.967 ccw(c114.114,15.219) 114.087,14.967 116.613,14.692 cw(c116.466,13.338) 116.789,14.661 cw(c116.659,14.122) 116.791,14.66 ccw(c117.5,17.5) 118.927,14.944 ; 118.928,14.945 119.307,15.153 ccw(c119.184,15.376) 119.32,15.162 123,17.5 NIXIE2.3@123.25,17.5 123.5,17.5 133.217,15.564 ccw(c133.265,15.813) 133.226,15.562 136.778,15.016 cw(c136.571,13.669) 137.172,14.892 cw(c136.685,13.897) 137.178,14.888 cw(c136.685,13.897) 137.18,14.887 cw(c137.067,14.66) 137.182,14.887 ccw(c138.5,17.5) 140.469,15.334 141.142,15.811 ccw(c141.068,16.054) 141.198,15.836 144,17.5 NIXIE1.3@144.25,17.5 144.5,17.5 J2.12@151.73,14.96